# Altium PCB TYPEC_4KRECEIVER-v1.0.PcbDoc (part 10 of 12)
Units mil, origin at the board's own origin, x right, y up, seen from the top; angles counter-clockwise.
Board outline 2834.7 x 1259.84 mil, 10 copper layers (Top Layer, GND-1, Signal L1, GND-2, PWR-1, PWR-2, GND-3, Signal L2, GND-4, Bottom Layer), stack 61.686 mil thick; 492 components, 339 nets, 2214 pads, 1169 vias.
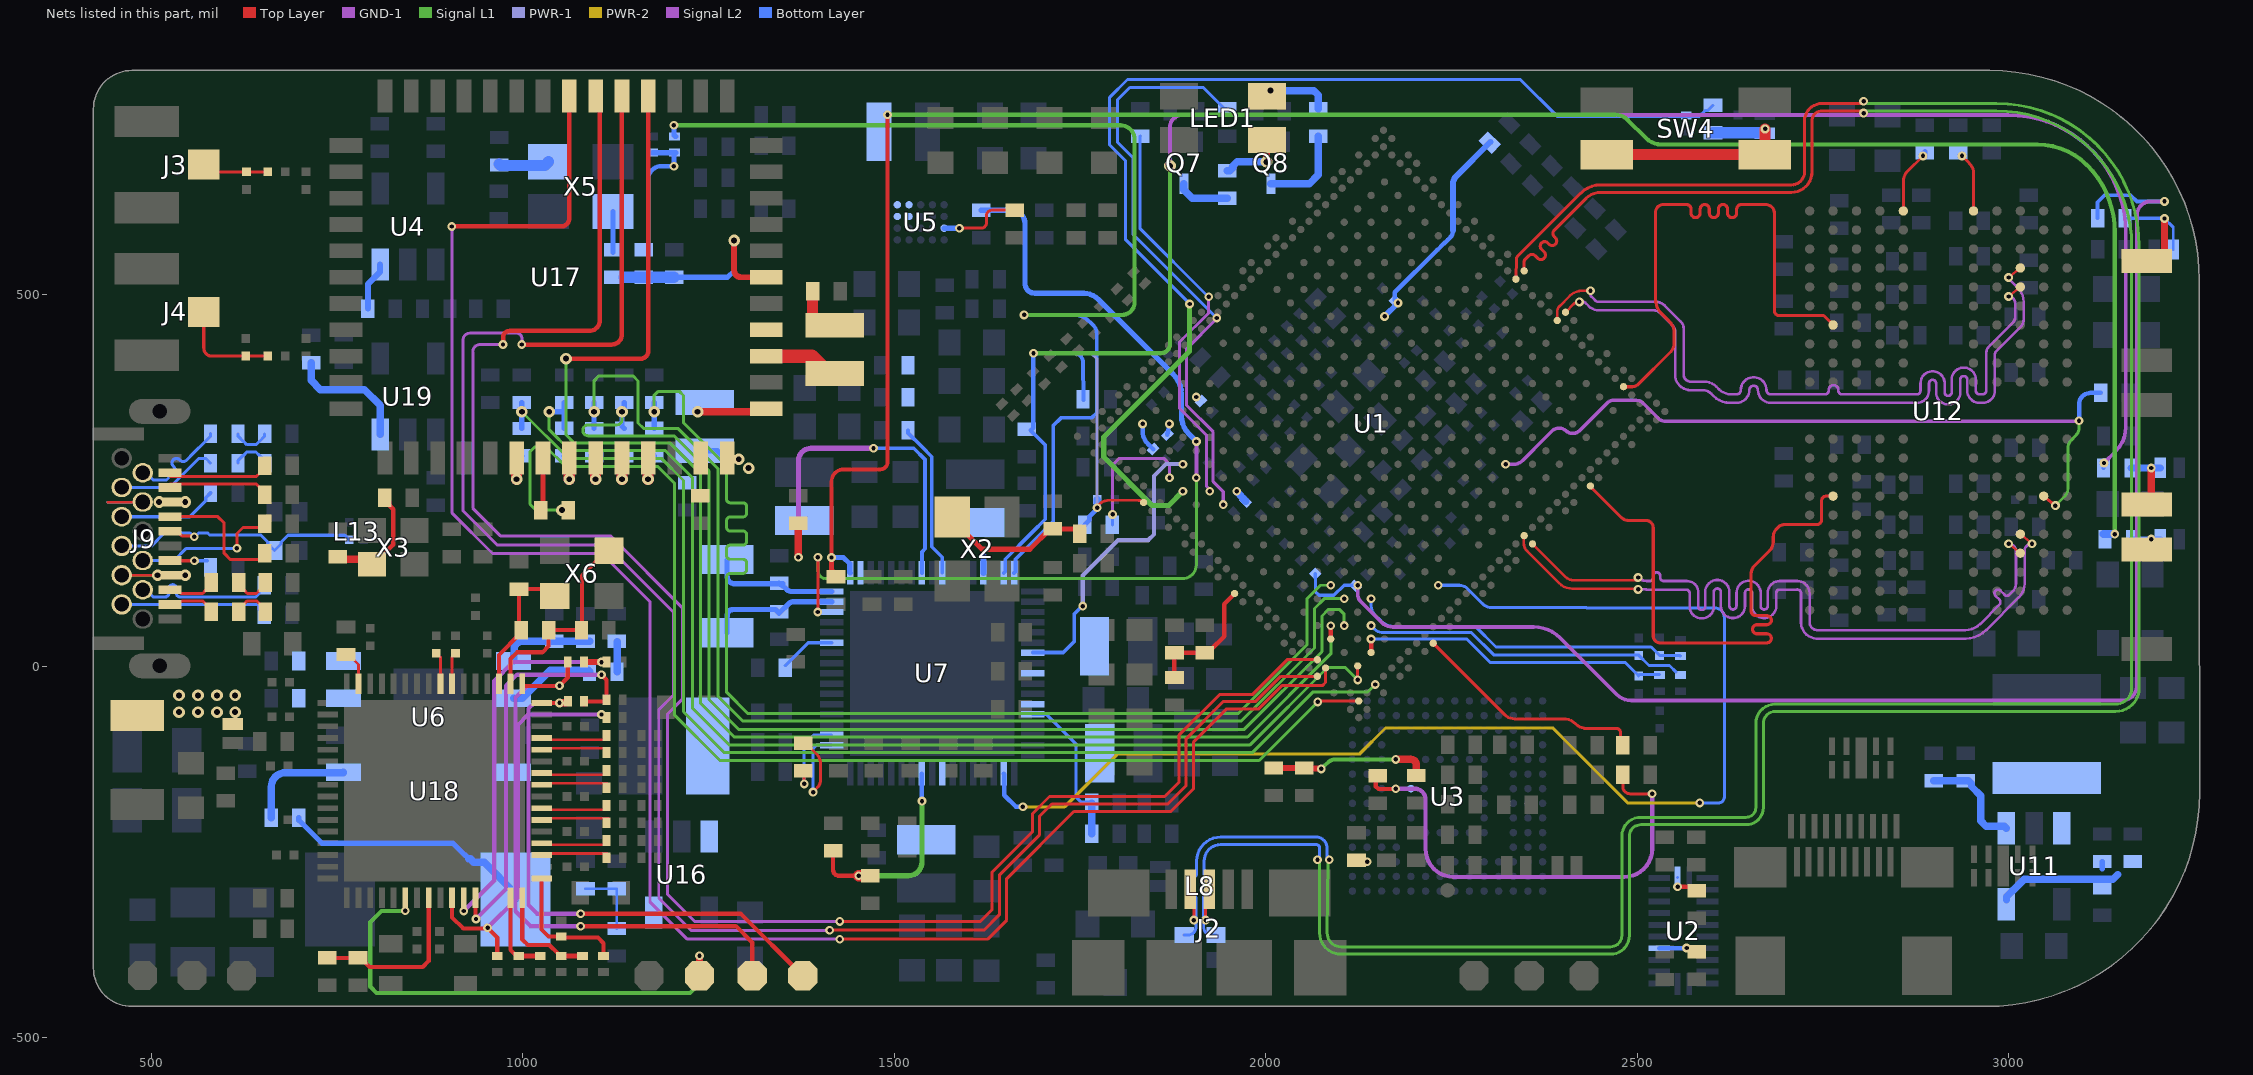
[diagram p15: the nets of this part, all layers, seen from the top]

## Via types
v1: diameter 11.81, hole 5.91, Top Layer to Bottom Layer, tented both sides, 698 vias
v2: diameter 15.75, hole 7.87, Top Layer to Bottom Layer, tented both sides, 248 vias
v3: diameter 11.81, hole 5.91, Top Layer to Signal L1, tented both sides, 121 vias
v4: diameter 11.81, hole 5.91, Top Layer to Bottom Layer, 44 vias
v5: diameter 11.81, hole 5.91, Signal L2 to Bottom Layer, 41 vias
v6: diameter 11.81, hole 5.91, Top Layer to Signal L1, 17 vias

## Nets (pads, with @x,y where several pads share a name; then routed paths per layer and width w, separated by ;. In a path a pad name is that pad's centre, name@x,y a point inside that pad or via, vN(x,y) a via of type N, cw(c..) or ccw(c..) an arc to the next point about the centre after c; other vN are vias at no path point) (continued)
LPDDR4_DQS1_A_N: U1.N2 U12.E10 | length 1014
  Top Layer w3.5: U1.N2@2392.59,465.02 2392.59,476.72 cw(c2404.08,476.72) 2393.97,482.17 cw(c2404.08,476.72) 2395.96,484.84 2409.4,498.28 cw(c2425.68,482) 2425.68,505.03 v1(2437.36,505.03) ; v1(3000.07,497.37) U12.E10@3015.82,510.17
  Signal L2 w3.5: v1(2437.36,505.03) 2437.36,499.79 ccw(c2441.3,499.79) 2438.5,497.02 2443.1,492.42 ccw(c2448.72,498.21) 2448.72,490.14 2525.32,490.14 cw(c2525.32,473.51) 2537.12,485.23 2558.34,464 2558.95,463.39 cw(c2549.9,454.33) 2562.7,454.33 2562.7,453.46 2562.7,392.15 ccw(c2572.14,392.15) 2572.14,382.72 2590.25,382.72 ; 2590.43,382.72 cw(c2590.5,359.9) 2606.69,375.98 2606.8,375.87 2610.23,372.43 ccw(c2626.4,388.6) 2626.4,365.74 2633.9,365.74 ccw(c2633.9,371.49) 2639.65,371.49 cw(c2656.9,371.5) 2674.15,371.5 ccw(c2679.9,371.49) 2679.9,365.74 2745.06,365.74 2752.94,365.74 ccw(c2752.94,370.76) 2757.96,370.76 2757.96,370.89 cw(c2764.44,371.5) 2770.92,370.86 2770.92,370.74 ccw(c2775.93,370.74) 2775.93,365.74 2783.82,365.74 2876.71,365.74 ccw(c2876.71,370.49) 2881.46,370.49 2881.46,380.46 cw(c2897.71,380.46) 2913.96,380.46 2913.96,368.33 ccw(c2918.71,368.33) 2923.46,368.33 2923.46,385.46 cw(c2939.71,385.46) 2955.96,385.46 2955.96,370.49 ccw(c2960.71,370.49) 2960.71,365.74 2964.69,365.74 ccw(c2964.69,371.19) 2970.14,371.19 2970.14,420.56 2970.14,421.96 cw(c2981.37,422) 2973.43,429.94 3006.44,462.95 ccw(c3000.73,468.67) 3008.81,468.67 3008.81,488.63 ccw(c3000.07,488.63) 3005.1,495.78 ccw(c3000.07,488.63) v1(3000.07,497.37)
LPDDR4_DQS1_A_P: U1.N1 U12.D10 | length 1008
  Top Layer w3.5: U1.N1@2404.09,476.15 2404.09,476.72 2414.48,487.1 cw(c2421.55,480.02) 2421.55,490.03 v1(2422.36,490.03) ; v1(3000.07,522.96) U12.D10@3015.82,535.76
  Signal L2 w3.5: v1(2422.36,490.03) 2427.59,490.03 cw(c2427.59,486.09) 2430.37,488.88 2434.97,484.29 2435.21,484.05 ccw(c2448.72,498.21) 2448.72,478.64 2522.45,478.64 cw(c2522.45,466.58) 2530.97,475.11 2547.29,458.78 cw(c2537.85,449.34) 2551.2,449.34 2551.2,392.15 ccw(c2572.14,392.15) 2572.14,371.22 2588.33,371.22 ; 2588.42,371.22 cw(c2588.41,354.85) 2599.98,366.42 2600.02,366.38 2603.18,363.22 ccw(c2624.79,384.72) 2624.79,354.24 2633.9,354.24 ccw(c2633.9,371.49) 2651.15,371.49 cw(c2656.9,371.5) 2662.65,371.5 ccw(c2679.9,371.49) 2679.9,354.24 2876.71,354.24 ccw(c2876.71,370.49) 2892.96,370.49 2892.96,380.46 cw(c2897.71,380.46) 2902.46,380.46 2902.46,368.33 ccw(c2918.71,368.33) 2934.96,368.33 2934.96,385.46 cw(c2939.71,385.46) 2944.46,385.46 2944.46,370.49 ccw(c2960.71,370.49) 2960.71,354.24 2965.01,354.24 ccw(c2965.01,370.87) 2981.64,370.87 2981.64,419.88 cw(c2986.51,419.87) 2983.06,423.31 3016.1,456.35 ccw(c3005.94,466.51) 3020.31,466.51 3020.31,490.12 ccw(c2992.82,490.12) 3012.26,509.56 3000.07,521.75 v1(3000.07,522.96)
LPDDR4_DQS1_B_N: U1.B17 U12.V10 | length 1059.3
  Top Layer w3.5: U1.B17@2348.05,175.49 2347.57,175.01 2347.57,165.35 ccw(c2362.57,165.35) 2351.95,154.75 2395.12,111.51 ccw(c2412.9,129.17) 2412.97,104.11 v1@2500.27,104.11 ; U12.V10@3015.82,177.49 v1(3031.57,164.69)
  Signal L2 w3.5: v1(2501.36,103.11) 2512.21,102.92 ccw(c2512.7,130.45) 2512.69,102.91 2554.6,102.88 2559.42,102.88 2565.57,102.88 cw(c2565.57,97.66) 2570.75,98.37 cw(c2567.28,97.9) 2570.78,97.91 2570.79,91.51 2570.79,80.55 ; 2570.79,80.54 2570.79,80.27 ccw(c2587.04,80.27) 2603.29,80.27 2603.29,99.53 cw(c2608.04,99.53) 2612.79,99.53 2612.79,80.77 ccw(c2629.04,80.77) 2645.29,80.77 2645.29,98.4 cw(c2650.04,98.4) 2654.79,98.4 2654.79,80.77 ccw(c2671.04,80.77) 2687.29,80.77 2687.29,98.14 cw(c2692.04,98.14) 2692.04,102.89 2698.23,102.89 2715.64,102.91 cw(c2715.64,97.85) 2720.7,97.85 2720.7,58.5 ccw(c2742.44,58.61) 2741.4,36.89 ccw(c2742.08,51.88) 2742.03,36.88 2748.37,36.88 2941.99,36.88 ccw(c2941.9,76.45) 2969.71,48.3 2970.08,48.67 3014.02,92.61 ccw(c2995.85,110.81) 3021.57,110.81 3021.57,154.69 cw(c3031.57,154.69) v1(3031.57,164.69)
LPDDR4_DQS1_B_P: U1.A17 U12.W10 | length 1057.4
  Top Layer w3.5: U1.A17@2359.19,164.36 2403.55,120 ccw(c2414.15,130.61) 2414.15,115.61 2497.86,115.61 ccw(c2497.86,119.11) v1(2501.36,119.11) ; v1(3000.07,164.69) U12.W10@3015.82,151.9
  Signal L2 w3.5: v1(2501.36,119.11) ccw(c2512.7,130.45) 2506.18,115.8 ccw(c2512.7,130.45) 2512.7,114.41 2516.91,114.41 ccw(c2516.91,119.16) 2521.66,119.16 2521.66,121.19 cw(c2526.41,121.19) 2531.16,121.19 2531.16,119.16 ccw(c2535.91,119.16) 2535.91,114.41 2567.19,114.41 cw(c2567.19,99.31) 2582.17,101.26 2582.29,97.78 2582.29,80.55 ; 2582.29,80.52 2582.29,80.27 ccw(c2587.04,80.27) 2591.79,80.27 2591.79,99.53 cw(c2608.04,99.53) 2624.29,99.53 2624.29,80.77 ccw(c2629.04,80.77) 2633.79,80.77 2633.79,98.4 cw(c2650.04,98.4) 2666.29,98.4 2666.29,80.77 ccw(c2671.04,80.77) 2675.79,80.77 2675.79,98.16 cw(c2692.04,98.16) 2692.04,114.41 2715.64,114.41 cw(c2715.64,97.85) 2732.2,97.85 2732.2,58.53 ccw(c2742.44,58.61) 2741.93,48.38 ccw(c2742.08,51.88) 2742.06,48.38 2748.37,48.38 2941.97,48.38 ccw(c2941.9,76.45) 2961.61,56.46 2961.95,56.8 ; 2961.97,56.82 2987.72,82.57 ccw(c2984.35,85.92) 2987.71,89.28 2982.56,94.43 cw(c2986.18,98) 2982.58,101.59 cw(c2985.71,98.46) 2988.83,101.6 2994.43,96 ccw(c2997.79,99.36) 3001.14,96 3005.81,100.66 3006.33,101.22 ccw(c2995.52,110.95) 3007.43,102.59 ccw(c2995.52,110.95) 3010.07,110.95 3010.07,154.69 ccw(c3000.07,154.69) v1(3000.07,164.69)
LPDDR4_ODT0_CA_A: U1.E2 U12.G2 | length 745.5
  Top Layer w4.2: U1.E2@2481.68,375.93 2493.52,375.93 ccw(c2493.52,387.38) 2501.61,379.28 ; 2501.61,379.29 2545.06,422.73 ccw(c2533.47,434.31) 2549.86,434.31 2549.86,448.58 ccw(c2528.25,448.58) 2543.53,463.86 2532.49,474.9 cw(c2550.91,493.32) 2524.86,493.32 2524.86,610.71 cw(c2535.28,610.71) 2535.28,621.13 2566.43,621.13 cw(c2566.43,614.98) 2569.94,620.03 cw(c2566.43,614.98) 2572.58,614.98 2572.58,609.69 ccw(c2578.73,609.69) 2584.88,609.69 2584.88,614.98 cw(c2591.03,614.98) 2597.18,614.98 2597.18,609.69 ccw(c2603.33,609.69) 2609.48,609.69 2609.48,614.98 cw(c2615.63,614.98) 2621.78,614.98 2621.78,609.69 ccw(c2627.93,609.69) 2634.08,609.69 2634.08,614.98 cw(c2640.23,614.98) 2640.23,621.13 2673.17,621.13 cw(c2673.17,609.44) 2684.86,609.44 2684.86,478.17 ccw(c2691.33,478.17) 2691.33,471.69 2751.14,471.69 U12.G2@2763.85,458.99
LPDDR4_ODT0_CA_B: U1.A10 U12.T2 | length 760
  Top Layer w4.2: U1.A10@2437.14,242.31 2437.14,241.55 2478.35,200.33 ccw(c2488.96,210.94) 2488.96,195.94 2511.88,195.94 cw(c2511.88,186.12) 2521.7,186.12 2521.7,40.46 ccw(c2531.03,40.46) 2531.03,31.13 2674.69,31.13 ccw(c2674.69,36.97) 2678.82,32.84 ; 2674.61,31.15 ccw(c2674.61,37.25) 2674.61,43.35 2661.47,43.35 cw(c2661.47,49.45) 2661.47,55.55 2674.61,55.55 ccw(c2674.61,61.65) 2674.61,67.75 2659.63,67.75 cw(c2659.63,73.85) 2653.53,73.85 2653.53,124.14 cw(c2669.04,124.14) 2658.1,135.13 2678.86,155.88 ; 2678.86,155.89 ccw(c2668.31,166.43) 2683.23,166.43 2683.23,174.11 cw(c2697.3,174.11) 2687.34,184.05 ; 2687.35,184.06 2690.64,187.36 cw(c2697.78,180.26) 2697.78,190.33 2741.87,190.33 ccw(c2741.87,196.87) 2748.41,196.87 2748.41,222.66 cw(c2754.41,222.66) 2754.41,228.66 U12.T2@2763.85,228.67
LPDDR4_RESETn: C238.2 U1.1C7 U12.T11 | length 1040.1
  Top Layer w4.1: U12.T11@3047.31,228.67 v1(3063.06,215.87)
  Signal L1 w4: v1(3063.06,215.87) 3075.47,228.28 ccw(c3064.86,238.88) 3079.86,238.88 3079.86,293.28 cw(c3094.86,293.28) 3084.24,303.88 3090.47,310.11 ccw(c3079.86,320.71) 3094.86,320.71 v1(3094.86,330.03)
  Signal L2 w4.7: v1(2322.99,271.54) 2333.77,271.54 ccw(c2333.77,288.93) 2346.05,276.62 ; 2346.06,276.63 2377.79,308.36 ; 2377.81,308.39 2386.01,316.56 cw(c2394.98,307.57) 2388.82,318.68 cw(c2394.98,307.57) 2401.78,318.3 cw(c2394.98,307.57) 2401.96,318.19 2404.51,316.51 ; 2417.68,313.84 cw(c2413.47,325.83) 2406.5,315.21 2404.51,316.51 ; 2422.18,316.34 cw(c2413.44,325.82) 2404.51,316.51 ; 2422.2,316.36 2459.88,354.03 cw(c2468.31,345.6) 2468.31,357.53 2498.64,357.53 cw(c2498.64,343.77) 2508.37,353.5 2528.28,333.59 ccw(c2538.57,343.88) 2528.35,333.52 ccw(c2538.57,343.88) 2538.57,329.33 v1@3094.86,329.33
  Bottom Layer w6: v1(3094.86,330.03) 3094.86,352.26 cw(c3109.86,352.26) 3099.25,362.86 3099.52,363.13 cw(c3110.13,352.53) 3110.13,367.53 C238.2@3123.86,367.53
LT6711A_DDC_SCL: R124.2 R145.2 U18.59 | length 530.8
  Top Layer w3.5: v6@920.79,-329.79 U18.59@920.8,-311.78
  Top Layer w8: R124.2@1082.42,5.47 R145.2@1113.06,5.47
  GND-1 w5.6: v6(920.77,-329.81) 961.77,-288.8 961.77,-19.99 987.07,5.3 v3@1106.65,5.3
  other v3: 1106.22,5.3
LT6711A_DDC_SDA: R125.2 R146.2 U18.60 | length 563.8
  Top Layer w5.6: U18.60@936.55,-311.78 936.55,-339.77 v6(937.3,-340.52) ; R125.2@1082.71,-51.44 1086.28,-47.88 1110.62,-47.88 R146.2@1113.06,-45.44 1113.06,-18.52 v3(1106.22,-11.68)
  GND-1 w5.6: v6(937.3,-340.52) 977.84,-299.99 977.84,-26.55 992.71,-11.68 v3(1106.22,-11.68)
LT6711A_RST_N: C324.2 R132.2 U18.56 | length 230.5
  Top Layer w5.6: C324.2@737.03,-392.79 781.9,-392.79 R132.2@788.1,-398.99 ; R132.2@788.1,-399.04 794.3,-405.24 865.58,-405.24 873.56,-397.26 U18.56@873.56,-311.77
LT6711A_RXHPD: R147.2 R148.2 U18.58 | length 533
  Top Layer w5.6: 905.05,-338.52 U18.58@905.05,-311.77 ; 905.15,-338.52 920.15,-353.52 947.19,-353.52 947.26,-353.45 951.65,-353.45 v6(952.84,-352.27) 965.82,-365.25 R148.2@965.82,-390.47
  GND-1 w5.6: v6(952.84,-352.27) 993.71,-311.4 993.71,-79.13 1007.49,-65.34 v3(1106.22,-65.34)
LT6711A_S_SCL: R124.1 TP17.1 U18.17 | length 822.8
  Top Layer w5.6: U18.17@999.54,-23.77 999.54,-25.58 1000.68,-26.72 v1(1049.61,-26.72) 1060.77,-15.56 R124.1@1060.77,5.47 ; v4(1078.03,-350.19) 1286.97,-350.19 1309.05,-372.27 TP17.1@1309.05,-416.94
  Signal L2 w5.6: v1(1049.61,-26.72) 1006.44,-26.72 990.64,-42.52 990.64,-330.11 1010.71,-350.19 v4(1078.03,-350.19)
LT6711A_S_SDA: R125.1 TP16.1 U18.16 | length 753.5
  Top Layer w5.6: U18.16@1025.43,-49.67 v1(1049.61,-49.67) ; R125.1@1058.17,-49.67 R125.1@1061.06,-49.67 ; v4(1078.03,-333.38) 1293.5,-333.38 TP16.1@1377.06,-416.94
  Top Layer w10: v1(1049.61,-49.67) R125.1@1058.17,-49.67
  Signal L2 w5.6: v1(1049.61,-49.67) 1015.71,-49.67 1007.94,-57.44 1007.94,-321.89 1019.42,-333.38 v4(1078.03,-333.38)
NetC5_2: C5.2 L1.1 U17.25 | length 35.5
  Bottom Layer w7: L1.1@1245.36,289.76 1262.18,289.76 L1.1@1275.41,276.53
  other v2: 1304.17,266.32 1290.99,278.37
NetC6_2: C6.2 C184.2 J3.1 | length 74.6
  Top Layer w4.2: J3.1@582.36,665.16 629.29,665.16 C6.2@656.98,665.16
NetC7_2: C7.2 C185.2 J4.1 | length 140.9
  Top Layer w4.2: J4.1@570.88,476.5 570.88,427.84 ccw(c581.59,427.84) 581.59,417.13 629.29,417.13 C7.2@656.98,417.13
NetC10_1: C10.1 U6.1 | length 149.7
  Bottom Layer w10: C10.1@661.81,-203.99 661.81,-162.52 cw(c680.61,-162.52) 680.61,-143.72 758.85,-143.72 U6.1@758.85,-143.28
NetC10_2: C10.2 L12.1 U6.8 | length 344.3
  Bottom Layer w7: C10.2@698.81,-203.99 698.81,-207.49 704.31,-212.99 704.48,-212.99 730.11,-238.62 906.39,-238.62 922.56,-254.78 923.14,-254.78 927.37,-259.02 927.37,-259.6
  Bottom Layer w10: 927.37,-259.6 929.52,-259.6 934.03,-264.11 948.17,-264.11 990.42,-306.35 L12.1@990.42,-314.28
NetC11_1: C11.1 R4.2 | length 41.5
  Bottom Layer w3.5: C11.1@1126.65,33.31 C11.1@1127.1,32.86
  Bottom Layer w10: R4.2@1127.1,-7.97 C11.1@1127.1,32.86
NetC31_1: C31.1 U7.46 | length 75.1
  Bottom Layer w4.5: C31.1@1353.68,0.59 1384.47,31.37 U7.46@1416.03,31.37
NetC33_2: C33.2 C128.2 R37.1 R45.1 R109.2 U1.AG38 U7.67 | length 3044.6
  Top Layer w4: v1(1773.2,212.98) 1774.71,216.74 1775.32,217.35 cw(c1789.61,202.46) 1789.61,223.09 1828.43,223.09 cw(c1828.43,212.65) 1829.71,223.02 cw(c1828.43,212.65) 1834.5,221.15 cw(c1828.43,212.65) U1.AG38@1835.82,220.04
  Signal L1 w5.6: v1(1687.55,420.97) 1858.95,420.97 ccw(c1858.95,433.33) 1871.31,433.33 v2(1871.31,673.21)
  PWR-1 w4: v1(1687.55,420.97) 1765.4,420.97 1773.2,413.17 v1(1773.2,212.98)
  Signal L2 w5: v2(1871.31,673.21) 1871.31,725.49 cw(c1887.34,725.49) 1872.77,732.16 cw(c1887.34,725.49) 1880.67,740.07 cw(c1887.34,725.49) 1887.34,741.52 1909.76,741.52 2999.52,741.52 cw(c2999.52,583.28) 3157.77,583.28 3157.77,321.73 cw(c3111.52,321.73) 3144.19,288.99 v5(3128.39,273.19)
  Bottom Layer w5: U7.67@1647.73,125.27 1649.56,127.1 1649.56,143.67 1685.75,179.87 1703.45,197.56 1703.45,297.41 1688.53,312.33 1688.42,312.33 C33.2@1685.03,315.72 ; v1(1687.55,420.97) 1742.12,420.97 cw(c1742.12,408.82) 1754.27,408.82 1755.04,358.99 R109.2@1755.06,358.08 ; R37.1@3127.86,266.54 3127.86,272.66 v5(3128.39,273.19)
  Bottom Layer w6: C33.2@1683.78,317.07 1687.55,320.84 v1(1687.55,420.97) ; R45.1@1756.68,190.07 1762.68,196.07 1762.68,200.86 1772.09,210.27 1772.09,211.86 v1(1773.2,212.98)
  Bottom Layer w10: v1(1773.2,212.98) C128.2@1773.2,223.91
NetC34_2: C34.2 U7.50 X1.1 | length 176.5
  Bottom Layer w7: X1.1@1275.18,44.81 1275.29,61 1275.34,69.18 cw(c1282.77,68.38) 1282.77,75.85 1340.36,75.85 1345.18,71.03 1357.68,83.53 cw(c1364.83,76.38) 1364.83,86.49 U7.50@1416.03,86.49
NetC35_2: C35.2 U7.51 X1.2 | length 178.2
  Bottom Layer w7: X1.2@1275.18,142.74 1275.18,121 ccw(c1285.6,121) 1285.6,110.58 C35.2@1350.24,110.58 ; C35.2@1344.24,110.58 C35.2@1345.18,111.53 ; C35.2@1345.18,110.53 1353.66,105.03 ccw(c1362.32,110.53) 1362.32,100.27 U7.51@1416.03,100.27
NetC36_2: C36.2 R5.1 R8.2 U7.61 | length 210.8
  Bottom Layer w5: R8.2@1518.68,317.21 1518.68,313.71 1537.4,294.99 1550.68,281.71 1550.68,160.46 1564.81,146.34 U7.61@1564.81,125.51
NetC37_2: C37.2 R31.1 U7.52 | length 2878.7
  Top Layer w5: v1(1415.77,146.12) 1415.77,248.36 cw(c1431.98,248.36) 1431.98,264.57 1481.18,264.57 ccw(c1481.18,274.48) 1491.09,274.48 v6(1491.09,742.07)
  Top Layer w7: C37.2@1415.77,126.1 v1(1415.77,146.12) ; C37.2@1418.77,126.1 C37.2@1421.78,123.1
  Signal L1 w5.6: v6@1492.43,742.07 2470.61,742.07 cw(c2470.61,718.39) 2487.34,735.15 ; 2487.36,735.13 2511.87,710.62 ccw(c2533.01,731.83) 2533.01,701.88 3038.74,701.88 ; 3038.78,701.88 cw(c3038.8,607.32) 3105.73,674.13 cw(c3015.5,584.07) 3142.98,584.07 v1(3142.98,177.51)
  Bottom Layer w7: v1@1418.77,146.12 1431.6,146.12 1440.2,137.52 1440.2,126.1 U7.52@1441.03,125.27
  Bottom Layer w11: R31.1@3127.79,177.51 v1(3142.98,177.51)
NetC39_1: C39.1 U7.37 | length 114.1
  Top Layer w4.1: C39.1@1377.68,-140.76 1378.97,-142.04 v1(1378.97,-158.71)
  Bottom Layer w4.1: v1(1378.97,-158.71) 1378.74,-158.48 1378.74,-105.97 1392.07,-92.65 U7.37@1416.03,-92.65
NetC39_2: C39.2 U7.36 | length 164.1
  Top Layer w4.1: C39.2@1377.68,-103.76 1381.18,-103.76 1388.13,-110.71 1388.13,-110.93 1395.65,-118.45 ; v1@1392.35,-168.06 1396.78,-163.63 ccw(c1386.16,-153.03) 1401.16,-153.03 1401.16,-131.76 ccw(c1382.35,-131.76) 1395.67,-118.46
  Bottom Layer w4.1: v1(1390.97,-169.74) 1390.97,-153.8 1390.61,-153.44 1390.61,-111.68 1395.86,-106.43 U7.36@1416.03,-106.43
NetC56_2: C56.2 R169.2 | length 51.8
  Top Layer w4.1: C56.2@617.86,112.42 617.85,108.87 624.81,101.92 625.18,101.92 629.4,97.69 641.8,97.69 646.03,101.91 646.4,101.91 653.36,108.87 R169.2@653.36,112.39
NetC57_2: C57.2 R170.2 | length 51.8
  Top Layer w4.1: C57.2@617.85,73.08 617.85,76.6 624.8,83.55 625.17,83.55 629.4,87.77 641.8,87.77 646.03,83.56 646.4,83.56 653.35,76.6 R170.2@653.35,73.08
NetC58_2: C58.2 R173.2 | length 51.8
  Bottom Layer w4.1: C58.2@617.17,273.28 617.17,276.8 624.13,283.76 624.5,283.76 628.72,287.98 641.12,287.98 645.35,283.77 645.72,283.77 652.68,276.81 R173.2@652.68,273.29
NetC59_2: C59.2 R174.2 | length 51.8
  Bottom Layer w4.1: C59.2@617.18,312.57 617.18,309.05 624.13,302.09 624.5,302.09 628.73,297.87 641.14,297.88 645.36,302.1 645.73,302.1 652.68,309.05 R174.2@652.68,312.57
NetC129_2: C129.2 R46.2 X2.1 | length 206.4
  Top Layer w7: X2.1@1578.32,200.83 1578.32,196.9 1598.44,176.78 1598.88,176.78 1618.45,157.21 1682.47,157.21 1709.78,184.53 C129.2@1713.28,184.53 1744.28,184.53 1749.78,179.03 R46.2@1749.78,178.03
NetC151_2: C151.2 R29.1 U1.1N5 U1.1N6 | length 291.2
  Bottom Layer w6: C151.2@2174.03,492.41 2173.88,492.56 2173.88,495.8 2174.03,495.95 2174.03,502.9 2231.16,560.03 2231.45,560.03 2240,568.58 cw(c2244.21,564.3) 2240.48,569 ccw(c2232.52,579.16) 2241.62,570.02 ccw(c2232.52,579.16) 2241.77,570.17 2245.42,573.89 2250.58,579.16 ccw(c2237.36,586.24) 2252.36,586.24
  Bottom Layer w8: v1(2160.14,470.59) v1(2178.23,488.68) ; 2252.36,586.24 2252.36,648.81 cw(c2267.36,648.81) 2256.75,659.42 R29.1@2302.81,705.48
NetC167_2: C167.2 L9.1 U17.29 | length 69.7
  Top Layer w15: L9.1@1390.33,461.9 1399.56,452.67 L9.1@1419.83,452.67 ; L9.1@1390.33,467.9 C167.2@1390.33,504.24
NetC203_2: C203.2 R99.1 U11.1 | length 146.3
  Bottom Layer w10: R99.1@2899.07,-154.63 C203.2@2942.59,-154.62 2946.09,-154.62 2950.09,-158.62 2950.09,-162.12 2962.36,-174.4 2962.36,-208.44 2969.63,-215.72 2994.28,-215.72 U11.1@2996.95,-218.39
NetC216_2: C216.2 D11.2 R39.2 SW4.1 SW4.3 | length 312.7
  Top Layer w15: SW4.1@2459.06,688.29 SW4.3@2671.66,688.29 ; SW4.3@2672.36,688.99 v1(2672.36,722.86)
  Bottom Layer w15: R39.2@2602.17,717.68 D11.2@2668.41,717.68
NetC251_1: C251.1 R28.2 R107.2 U3.K5 | length 232.8
  Top Layer w8: R28.2@2011.19,-137.34 2011.32,-137.48 2052.31,-137.48 2052.75,-137.91 2074.3,-137.91 v3(2074.86,-138.47)
  Top Layer w10: v1(2175.19,-125.74) 2195.64,-125.76 cw(c2195.64,-132.72) 2202.6,-132.72 R107.2@2202.6,-147.31
  Signal L1 w5.6: v3(2074.86,-138.47) 2074.86,-137.48 2085.64,-128.47 cw(c2093.16,-137.48) 2093.16,-125.74 v1@2172.2,-125.74
  Bottom Layer w4: v1(2175.19,-125.74) U3.K5@2195.64,-125.76
NetC252_2: C252.2 U3.C2
  other v1: 2136.59,-263.56
NetC254_1: C254.1 R100.1 R101.2 U11.5 | length 176
  Bottom Layer w7: 3126.19,-273.25 C254.1@3126.19,-263.07
  Bottom Layer w10: U11.5@2997.2,-314.49 2997.2,-310.66 3005.26,-302.6 3005.53,-302.6 3021.21,-286.91 3140.52,-286.91 3146.77,-280.66
NetC275_2: C275.2 R159.1 X3.3 | length 156.8
  Top Layer w6: X3.3@797.31,136.88 799.28,136.88 825.89,163.49 825.89,210.96 820.35,216.5 820.35,220.73 R159.1@814.35,226.73
  Top Layer w10: C275.2@751.07,143.89 790.3,143.89 X3.3@797.31,136.88
NetC292_1: C292.1 R113.1 R118.1 U16.5 | length 95.8
  Bottom Layer w3.5: R118.1@1084.6,-299.77 C292.1@1126.89,-299.77 R113.1@1126.89,-353.29
NetC320_1: C320.1 U18.23 | length 42.9
  Top Layer w4.1: U18.23@905.05,-23.78 905.05,12.39 C320.1@909.8,17.14
NetC321_1: C321.1 U18.24 | length 35.6
  Top Layer w4.1: U18.24@889.3,-23.78 C321.1@889.3,11.87
NetD3_2: D3.2 R44.2 SW3.1 | length 278.2
  Top Layer w5: SW3.1@3158.89,545.39 SW3.1@3186.17,545.39 3209.87,559.03 3196.14,555.35 SW3.1@3158.89,545.39
  Top Layer w10: SW3.1@3186.17,545.39 3196.14,555.35 3208.7,555.35 3209.87,556.53 v1(3209.87,602.3)
  Bottom Layer w4: v1(3209.87,602.3) 3221.67,590.5 D3.2@3221.67,560.58
  Bottom Layer w5: R44.2@3159.81,602.53 3209.64,602.53 v1(3209.87,602.3)
NetJ9_A5: J9.A5 R116.2 | length 47.5
  Top Layer w5: J9.A5@527.36,141.93 527.51,141.77 v1@557.97,141.77
  Bottom Layer w5: v1(558.27,141.77) R116.2@575.09,141.77
NetJ9_A8: J9.A8 R114.2 | length 180.2
  Top Layer w4.1: J9.A8@525.36,200.99 589.81,200.99 598.36,192.45 598.36,151.66 606.81,143.21 646.59,143.21 653.09,149.71 R114.2@653.09,151.69
NetJ9_B5: J9.B5 R117.2 | length 133.1
  Bottom Layer w5: J9.B5@462.4,200.99 551.94,200.99 573.36,222.41 573.36,226.53 R117.2@579.86,233.03
NetJ9_B8: J9.B8 R115.2 | length 194.5
  Top Layer w4.1: v1(615.48,158.45) 615.48,178.22 623.73,186.47 648.04,186.47 R115.2@653.09,191.53
  Bottom Layer w4.1: J9.B8@490.73,141.93 530.88,141.93 547.4,158.45 v1(615.48,158.45)
NetL1_2: L1.2 U17.26 | length 94.1
  Top Layer w10: v2(1235.57,342.23) 1323.93,342.23 U17.26@1327.97,346.26
NetL2_1: L2.1 U5.D3 U5.D4 U5.E3 U5.E4
NetL3_2: L3.2 U7.12
NetL4_2: L4.2 U7.9
NetL5_1: L5.1 U7.53
NetL6_2: L6.2 U7.65 | length 23.2
  Bottom Layer w8: U7.65@1620.17,125.27 1620.17,148.44
NetL7_2: L7.2 U7.25
NetL9_2: L9.2 U17.28 | length 103.2
  Top Layer w18: U17.28@1327.97,417.13 1389.52,417.13 L9.2@1418.95,387.71
NetL10_1: L10.1 U11.3
NetL11_1: L11.1 U16.3
NetLED1_1: LED1.1 R47.1 | length 88.5
  Top Layer w10: v2@2001.71,679.01 2001.27,679.45 2001.27,707.56 LED1.1@2001.71,708
  Bottom Layer w10: R47.1@1948.16,666.71 1951.66,666.71 1955.66,670.71 1955.66,672.77 1961.52,678.63 v2@2001.22,678.63
  other v2: 2001.27,678.57
NetLED1_3: LED1.3 R85.1 | length 85.4
  Top Layer w10: LED1.3@2001.54,767.24 LED1.3@2001.72,767.06
  Bottom Layer w10: v2(2006.54,774.45) 2064.82,774.45 2070.68,768.59 2070.68,754.23 2071.08,753.83 R85.1@2071.08,750.23
NetQ7_3: Q7.3 R47.2 | length 70.6
  Bottom Layer w10: Q7.3@1890.07,648.81 1890.07,640.93 1901.3,629.71 R47.2@1948.16,629.71
NetQ8_3: Q8.3 R85.2 | length 121.2
  Bottom Layer w10: Q8.3@2007.15,648.81 2058.81,648.81 2071.08,661.07 R85.2@2071.08,713.23
NetR2_2: R2.2 R95.2 R96.1 U17.31 | length 286.3
  Top Layer w8: v2(1284.73,572.73) 1284.73,532.76 ccw(c1294.27,532.76) 1294.27,523.22 U17.31@1327.76,523.22
  Bottom Layer w7: R95.2@1198.98,523.22 1275.94,523.22 1284.73,532.01 v2(1284.73,572.73)
  Bottom Layer w15: 1136.24,523.23 R2.2@1163.11,523.23 R95.2@1203.98,523.23
NetR3_1: R3.1 U7.59 | length 516.3
  Top Layer w10: v1(1371.18,146.47) R3.1@1371.18,192.23
  Signal L2 w7: v1(1371.18,146.47) 1371.18,275.98 cw(c1388.31,275.98) 1388.31,293.12 v5(1472.27,293.12)
  Bottom Layer w5: v5(1472.27,293.12) 1526.55,293.12 1541.68,277.98 1541.68,157.75 1537.49,153.55 U7.59@1537.49,125.27
NetR4_1: R4.1 U6.6 | length 118.5
  Bottom Layer w10: U6.6@987.86,-43.28 999.67,-43.28 1037,-5.95 1088.08,-5.95 R4.1@1090.1,-7.97
NetR10_1: R10.1 U7.68 | length 1528
  Signal L1 w5.6: v1(1203.61,727.79) 1804.65,727.79 cw(c1804.65,708.65) 1823.79,708.65 1823.79,489.59 cw(c1806.82,489.59) 1806.82,472.62 v1(1674.96,472.62)
  Bottom Layer w5: U7.68@1661.51,125.27 1663.34,127.1 1663.34,143.7 1714.28,194.64 1714.28,323.58 1724.67,333.97 1765.76,333.97 1772.66,340.87 1772.66,447.66 ccw(c1757.43,447.66) 1768.2,458.44 1763.49,463.15 ccw(c1740.51,440.17) 1740.53,472.66 1740.48,472.66 1675,472.66 v1(1674.96,472.62)
  Bottom Layer w7: v1(1203.61,727.79) 1203.61,714.41 1205.42,712.59 R10.1@1206.61,712.59
NetR11_2: R11.2 U6.4
NetR12_1: R12.1 U5.A2 | length 112.9
  Top Layer w4: v1@1588.06,589.32 1617.55,589.32 ccw(c1617.55,595.95) 1624.18,595.95 1624.18,606.04 cw(c1631.66,606.04) 1631.66,613.53 R12.1@1662.36,613.53
  Bottom Layer w7: U5.A2@1567.36,589.31 v1@1587.86,589.31
  other v1: 1587.86,589.11
NetR14_2: R14.2 U1.1V19 | length 38.7
  Bottom Layer w6: v1(1834.42,325.83) 1834.42,316 ccw(c1858.15,316) 1841.37,299.21 R14.2@1848.57,292.01
NetR15_2: R15.2 U1.1U18 | length 14.8
  Bottom Layer w6: R15.2@1867.74,311.41 1869.14,317.49 1870.61,325.81 v1(1870.52,325.83)
NetR20_2: R20.2 R23.2 U7.13 | length 212.1
  Bottom Layer w4.5: U7.13@1686.51,-65.09 1705,-65.09 1744.93,-105.02 1744.93,-176.34 1752.1,-183.51 1764.98,-183.51 R20.2@1765.89,-184.42
  Bottom Layer w10: R23.2@1765.89,-225.97 R20.2@1765.89,-184.42
NetR24_2: R24.2 R25.1 U7.27 | length 289
  Top Layer w5.6: R24.2@1417.97,-248.51 1417.97,-274.48 ccw(c1425.86,-274.48) 1425.86,-282.37 v6(1452.46,-282.4)
  Top Layer w15: v6(1452.46,-282.4) R25.1@1468,-282.37
  Signal L1 w7: v6(1452.46,-282.4) 1519.02,-282.4 ccw(c1519.02,-263.91) 1537.5,-263.91 v1(1537.5,-181.83)
  Bottom Layer w6: v1@1537.49,-176.02 U7.27@1537.49,-145.21
NetR27_2: R27.2 U4.3 | length 66.2
  Bottom Layer w8: R27.2@791.69,481.02 791.69,513.98 808.23,530.52 U4.3@808.23,540.37
NetR30_2: R30.2 U1.1M18 | length 18.1
  Bottom Layer w10: v1(1961.09,235.35) R30.2@1973.01,221.68
NetR32_2: R32.2 R33.1 U6.5 | length 124
  Bottom Layer w10: U6.5@987.86,6.72 988.23,13.54 988.76,23.47 988.86,25.36 cw(c999.67,21.99) 999.67,33.31 R32.2@1084.6,33.31 R32.2@1090.6,33.31
NetR34_2: R34.2 U1.1N19 | length 549.8
  Signal L2 w4.1: v5(1923.42,496.9) 1923.42,475.23 1884.22,436.04 1884.22,346.87 1920.39,310.71 1920.39,241.93 1924.89,237.43 v1(1924.89,235.34)
  Bottom Layer w4.1: R34.2@1831.36,713.23 1830.72,712.59 1830.72,589.13 v5@1923.18,496.67
NetR38_1: R38.1 U6.3
NetR41_2: R41.2 U1.1M19 | length 805
  Signal L2 w4.1: v5(1934.4,468.39) 1934.4,467.61 1893.3,426.5 1893.3,351.24 1929.42,315.12 1929.42,248.17 1942.99,234.6 v1(1942.99,217.25)
  Bottom Layer w4.1: v5@1935.06,467.73 v5(1934.4,468.39) 1821.25,581.54 1821.25,684.52 1800.52,705.25 1800.52,761.88 1817.28,778.64 1916.26,778.64 1944.66,750.23 R41.2@1948.16,750.23
NetR51_2: R51.2 U17.24
NetR53_2: R53.2 U1.A29 | length 318.2
  Top Layer w4.1: U1.A29@2225.56,30.73 2321.87,-65.58 ccw(c2335.02,-52.44) 2335.02,-71.02 2400.56,-71.02 cw(c2400.56,-94.77) 2408.12,-72.26 cw(c2400.56,-94.77) 2417.36,-77.98 ccw(c2431.93,-63.4) 2431.93,-84.02 2472.07,-84.02 cw(c2472.07,-89.55) 2477.6,-89.55 2477.6,-96.06 R53.2@2482.85,-106.51
NetR56_2: R56.2 R108.2 U3.H5 | length 665.2
  Top Layer w4.1: R56.2@2480.85,-146.47 2480.85,-162.29 ccw(c2490.53,-162.29) 2490.53,-171.97 v1(2520.21,-171.97)
  Top Layer w5.6: R108.2@2146.71,-147.63 2148.31,-149.23 2148.31,-162.12 2151.96,-165.77 2174.56,-165.77 v1(2175.19,-165.13)
  Signal L2 w5.6: v1@2172.2,-165.13 v1(2175.19,-165.13) 2200.86,-165.13 cw(c2200.86,-179.59) 2215.33,-179.59 2215.33,-246.17 ccw(c2253.06,-246.17) 2253.06,-283.9 2482.59,-283.9 ccw(c2482.59,-246.14) 2520.35,-246.14 v1@2520.35,-171.97
  Bottom Layer w4.1: v1(2175.19,-165.13) U3.H5@2195.64,-165.13
NetR57_2: R57.2 U17.17 | length 63.4
  Top Layer w15: v2(991.95,251.43) U17.17@991.95,279.73
  Bottom Layer w7: v2(991.95,251.43) 991.95,277.25 997.45,282.75 R57.2@998.95,282.75
NetR68_2: R68.2 U1.B37 | length 1625.3
  Top Layer w4: v3@2070.35,-47.22 U1.B37@2125.34,-47.22
  Signal L1 w4: v2(1052.77,209.74) 1018.07,209.74 1009.94,217.88 1009.94,288.44 1016.32,294.82 1031.47,294.82 1057.56,268.74 1181.61,268.74 1204.6,245.75 1204.6,-66.4 1265.52,-127.33 1991.33,-127.33 v3(2070.35,-48.31)
NetR69_2: R69.2 U17.19 | length 91.8
  Top Layer w7: v2@1062.69,251.43 v2(1062.81,251.43) U17.19@1062.81,279.73
  Top Layer w15: v2@1062.75,251.43 U17.19@1062.75,279.73
  Bottom Layer w7: R69.2@1055.81,282.76 1057.31,282.76 1062.81,277.26 v2(1062.81,251.43)
NetR70_2: R70.2 U17.20 | length 91.5
  Top Layer w7: v2@1098.12,251.43 v2(1098.25,251.43) U17.20@1098.25,279.73
  Top Layer w15: v2(1098.25,251.43) U17.20@1098.25,279.73
  Bottom Layer w7: R70.2@1091.58,282.75 1092.75,282.75 1098.25,277.25 v2(1098.25,251.43)
NetR73_1: R73.1 U1.1U16
  other v1: 1906.8,362.02
NetR76_1: R76.1 U2.11 | length 27
  Top Layer w6: v1(2554.54,-297.05) 2567.31,-297.05 cw(c2567.31,-315.1) R76.1@2580.07,-302.34
NetR77_1: R77.1 U2.4 | length 37
  Bottom Layer w6: U2.4@2529.88,-379.89 2530.07,-379.7 2566.51,-379.7 v1(2566.7,-379.51)
NetR80_2: R80.2 U17.21 | length 90.1
  Top Layer w7: v2@1133.55,251.43 v2(1133.68,251.43) U17.21@1133.68,279.73
  Top Layer w15: v2(1133.68,251.43) U17.21@1133.68,279.73
  Bottom Layer w7: R80.2@1128.68,282.76 1133.68,277.76 v2(1133.68,251.43)
NetR81_2: R81.2 U17.22 | length 65.7
  Top Layer w15: v2@1169.02,251.13 1168.97,251.18 1168.97,279.59 U17.22@1169.11,279.73
  Bottom Layer w7: v2@1168.83,250.76 v2(1168.83,251.43) 1168.83,277.26 1174.33,282.76 R81.2@1177.11,282.76
NetR94_2: R94.2 X5.1 | length 69.5
  Bottom Layer w15: R94.2@968.4,675.81 970.42,673.79 1030.16,673.79 X5.1@1035.06,678.69
NetR102_1: R102.1 U12.A8 | length 79.6
  Top Layer w4.1: v1(2937.36,686.53) 2947.37,676.51 ; 2947.38,676.5 cw(c2934.2,663.34) 2952.83,663.34 U12.A8@2952.82,612.53
NetR103_1: R103.1 U12.A5 | length 92.5
  Top Layer w4.1: U12.A5@2858.34,612.53 2858.34,652.3 cw(c2876.96,652.3) 2863.79,665.46 v1(2884.86,686.53)
  Bottom Layer w7: R103.1@2884.86,685.03 2887.36,687.53 R103.1@2887.36,692.32
NetR111_1: R111.1 R112.1 U18.1 | length 177.3
  Top Layer w5.6: U18.1@1025.43,-285.89 1025.43,-354.6 1034.84,-364.01 R111.1@1052.04,-364.01 1053.4,-365.37 1101.25,-365.37 1109.06,-373.18 R112.1@1109.06,-390.47
NetR119_1: R119.1 R120.1 U18.63 | length 112.7
  Top Layer w5.6: U18.63@983.79,-311.78 983.79,-381.98 R119.1@993.37,-391.56
  Top Layer w7: R119.1@994.83,-390.47 R120.1@1023.83,-390.47
NetR121_1: R121.1 R122.1 U18.64 | length 147.5
  Top Layer w5.6: U18.64@999.54,-311.78 999.54,-367.92 1006.98,-375.35 1035.88,-375.35 1047.56,-387.03 1047.56,-387.95 1051.23,-391.62 R122.1@1052.15,-391.62
  Top Layer w7: R122.1@1052.04,-390.47 R121.1@1080.45,-390.47
NetR123_2: R123.2 U19.3 | length 170
  Bottom Layer w10: R123.2@715.29,408.36 715.29,384.35 727.79,371.85 787.19,371.85 808.23,350.81 U19.3@808.23,311.63
NetR129_1: R129.1 U18.31 | length 48.2
  Top Layer w4: R129.1@762.26,15.45 765.76,15.45 779.07,2.13 U18.31@779.07,-23.77
OSC_32KHZ: R96.2 X5.3 | length 54.8
  Bottom Layer w7: R96.2@1121.68,556.96 X5.3@1121.68,611.76
OTG0_VBUSDET: C141.2 R16.2 R17.1 U1.T38 | length 172.9
  Top Layer w6: R16.2@1877.36,-15.45 R17.1@1877.36,18.03 C141.2@1918.18,18.03 1923.18,23.03 1927.41,23.03 1944.17,39.79 1944.17,83.41 U1.T38@1958.31,97.55
PDM_CLK0_M0: U1.1A14 U7.19 | length 1739.5
  PWR-2 w4.1: v1(1673.36,-189.43) 1673.4,-189.47 1729.49,-189.47 1800.25,-118.71 2126.06,-118.71 2161.27,-83.5 2386.62,-83.5 2487.4,-184.27 v1(2584.36,-184.27)
  Bottom Layer w4.1: v1(2232.52,108.68) 2260.99,108.68 cw(c2260.99,93.68) 2271.59,104.3 2292.05,83.84 2292.09,83.8 ccw(c2304.39,96.25) 2304.42,78.74 2331.15,78.74 2411.2,78.74 2423.41,78.73 2423.53,78.73 cw(c2423.44,-37.47) 2431.5,78.45 ccw(c2432.36,90.37) 2431.57,78.44 ccw(c2432.36,90.37) 2432.18,78.42 2454.66,78.07 ccw(c2454.86,90.03) 2454.86,78.07 2604.66,78.07 cw(c2604.66,65.29) 2617.44,65.29 2617.44,-176.46 cw(c2609.63,-176.46) 2609.63,-184.27 v1(2584.36,-184.27)
  Bottom Layer w6: U7.19@1647.73,-145.21 1648.32,-145.8 1648.32,-173.76 1663.99,-189.43 v1(1673.36,-189.43)
PMIC_32KOUT_WIFI: R2.1 R9.2 R10.2 | length 190.8
  Bottom Layer w6: R2.1@1168.99,555.81 1168.99,655.18 cw(c1186.53,655.18) 1186.53,672.73 v1(1203.61,672.73)
  Bottom Layer w7: R9.2@1174.99,690.94 R10.2@1206.61,690.94 ; v1(1203.61,672.73) R10.2@1203.61,687.94
PMIC_INT: U1.1R19 U7.7 | length 399.2
  PWR-1 w5.6: v1(1753.95,80.6) 1753.95,121.69 1801.52,169.26 1842.01,169.26 1849.83,177.09 1849.83,255.93 1865.82,271.92 1888.33,271.92 v1(1888.71,271.54)
  Bottom Layer w5: U7.7@1686.67,18.13 1727.58,18.13 1742.47,33.02 1742.47,69.98 1753.1,80.6 v1(1753.95,80.6)
PMIC_SLEEP: R13.2 U1.1P19 U7.49 | length 1285.8
  Top Layer w4: v1(1397.31,72.71) 1397.31,144.3 v3@1399.49,146.47
  Signal L1 w4: v3(1397.49,146.47) 1397.49,128.77 ccw(c1408.73,128.77) 1408.73,117.53 1887.97,117.53 ccw(c1887.97,136.36) 1906.8,136.36 v1(1906.8,253.44)
  Signal L2 w5.6: v1(1906.8,253.44) 1906.85,253.5 1906.85,302.14 v5(1906.9,302.19)
  Bottom Layer w7: R13.2@1617.36,613.53 1658.47,613.53 cw(c1658.47,595.91) 1676.09,595.91 1676.09,515.09 ccw(c1689.45,515.09) 1689.45,501.73 1755.27,501.73 cw(c1755.27,474.81) 1774.26,493.89 cw(c1755.27,474.81) 1774.3,493.85 1875.99,392.16 cw(c1849.86,366.03) 1886.81,366.03 1886.81,336.49 ccw(c1921.11,336.49) 1896.86,312.24 v5(1906.9,302.19)
PWRON_KEY: D2.2 R31.2 SW2.2 | length 39.2
  Bottom Layer w7: R31.2@3164.86,170.79 v1(3192.13,170.79) D2.2@3204.08,170.79
RESET_KEY: D1.2 R37.2 SW1.2 | length 90.6
  Top Layer w10: SW1.2@3186.17,217.6 3192.13,223.56 v1(3192.13,266.54)
  Bottom Layer w10: R37.2@3164.86,266.54 v1(3192.13,266.54) D1.2@3204.08,266.54
RX1_N: J9.B10 R172.2 | length 211.1
  Bottom Layer w4.1: J9.B10@488.73,102.55 493.29,102.55 502.87,92.98 516.76,92.98 518.81,92.98 ccw(c518.81,98.03) 523.86,98.03 523.86,104.42 cw(c528.91,104.42) 533.96,104.42 533.96,98.03 ccw(c539.01,98.03) 539.01,92.98 547.03,92.98 567.9,92.98 ; 557.47,92.98 567.9,92.98 ; R172.2@652.36,108.45 645.41,101.5 645.41,97.5 640.88,92.98 567.9,92.98
RX1_P: J9.B11 R171.2 | length 200
  Bottom Layer w4.1: J9.B11@460.4,82.88 568.59,82.88 642.63,82.88 645.41,80.11 645.41,76.1 R171.2@652.36,69.15
RX2_N: J9.A10 R175.2 | length 140.3
  Top Layer w4.1: J9.A10@525.36,240.36 525.36,245.15 641.16,245.15 ; 641.55,245.01 645.77,240.79 646.14,240.79 653.1,233.84 R175.2@653.09,230.3
RX2_P: J9.A11 R176.2 | length 140.5
  Top Layer w4.1: J9.A11@525.36,260.04 525.36,255.25 641.89,255.25 645.77,259.12 646.14,259.12 653.09,266.08 R176.2@653.09,269.6
SARADC_VIN0/RECOVERY: C156.1 R44.1 R60.1 U1.1D17 | length 2015.7
  Signal L2 w5: v1(2123.94,108.68) 2123.94,96.54 ccw(c2137.17,96.54) 2127.81,87.2 ; 2127.82,87.19 2156.27,58.74 ccw(c2170.99,73.46) 2170.99,52.64 2360.86,52.64 cw(c2360.86,2.34) 2396.41,37.92 ; 2396.42,37.91 2472.54,-38.21 ccw(c2492.17,-18.61) 2492.17,-46.35 3152.31,-46.35 ccw(c3152.31,-25.71) 3172.95,-25.71 3172.95,606.98 cw(c3191.3,606.98) 3191.3,625.32 v5(3209.87,625.32)
  Bottom Layer w4.5: C156.1@2066.81,124.04 2066.81,118.87 2067.15,118.53 2067.15,100.03 2072.17,95.01 2092,95.01 2105.84,108.85 2119.33,108.85 R60.1@2120.72,107.46
  Bottom Layer w5: R44.1@3119.81,602.53 3119.81,624.13 3129.21,633.53 3164.52,633.53 3172.72,625.32 v5(3209.87,625.32)
SARADC_VIN1/HW_ID: C157.1 R61.2 U1.1C17 | length 456.6
  Bottom Layer w4.1: v1(2142.04,90.59) 2142.04,81.15 ccw(c2159.94,81.15) 2147.28,68.49 2154.83,60.94 ccw(c2173.03,79.15) 2173.03,53.4 2282.31,53.4 2310.01,25.7 2353.13,25.7 2518.89,25.7 C157.1@2530.35,14.25 2557.58,14.25 R61.2@2558.6,13.23
SARADC_VIN2: C158.1 R62.2 U1.1B18 | length 435.9
  Bottom Layer w4.1: v1(2142.04,54.4) 2146.81,49.62 ccw(c2158.33,61.15) 2158.33,44.85 2277.11,44.85 2306.95,15.01 2501.59,15.01 2515.98,0.62 2543.68,0.62 R62.2@2552.67,-8.37
SARADC_VIN3: C159.1 R63.2 U1.1A19 | length 426.6
  Top Layer w6: U1.1A19@2142.04,18.2 v1(2142.04,36.3)
  Bottom Layer w4.1: v1(2142.04,36.3) 2270.83,36.3 2302.11,5.02 2483.81,5.02 2498.36,-9.52 2498.49,-9.52 2502.21,-13.24 C159.1@2502.21,-13.38 ; C159.1@2502.48,-11.61 R63.2@2530.11,-11.61
SDMMC1_CLK: R68.1 U17.18 | length 70
  Top Layer w7: R68.1@1027.38,209.74 U17.18@1027.38,279.73
SDMMC1_CMD: R57.1 R135.2 U1.B35 | length 1593.5
  Signal L1 w4: v2@999.19,341.98 1061.68,279.49 1186.6,279.49 1216.5,249.58 1216.5,-61.47 1271.65,-116.61 1982.15,-116.61 2064.02,-34.74 2137.82,-34.74 v1(2147.61,-24.95)
  Bottom Layer w7: R57.1@998.95,319.75 v2(998.94,342.23) R135.2@998.94,354.73
SDMMC1_D0: R80.1 R138.2 U1.1C19 | length 1593.5
  Signal L1 w4: v2(1133.68,342.23) 1133.68,331.07 cw(c1127.23,331.07) 1127.23,324.62 1088.73,324.62 ccw(c1088.73,316.95) 1081.06,316.95 ccw(c1088.14,316.95) 1088.14,309.87 1203.63,309.87 1250.78,262.73 1250.78,-45.23 1290.7,-85.16 1971.34,-85.16 2075.82,19.32 2075.82,67.4 2084.17,75.74 2099.83,75.74 2105.85,69.72 v1(2105.85,54.4)
  Bottom Layer w7: v2(1133.68,342.23) 1133.68,322.76 R80.1@1136.68,319.76 ; v2@1136.67,342.23 R138.2@1136.67,354.73
SDMMC1_D1: R81.1 R139.2 U1.1E18 | length 1593.6
  Signal L1 w4: v2(1177.11,342.23) 1177.11,364.46 1181.9,369.24 1211.51,369.24 1216.5,364.26 1216.5,327.28 1274.59,269.2 1274.59,226.42 1274.59,224.42 ccw(c1279.34,224.42) 1279.34,219.67 1296.69,219.67 cw(c1296.69,214.92) 1301.44,214.92 1301.44,205.42 cw(c1296.69,205.42) 1296.69,200.67 1279.33,200.67 ccw(c1279.33,195.92) 1274.58,195.92 1274.58,186.42 ccw(c1279.33,186.42) 1279.33,181.67 1296.69,181.67 cw(c1296.69,176.92) 1301.44,176.92 1301.44,167.42 cw(c1296.69,167.42) 1296.69,162.67 1279.33,162.67 ccw(c1279.33,157.92) 1274.58,157.92 1274.58,148.42 ccw(c1279.33,148.42) 1279.33,143.67 1296.69,143.67 cw(c1296.69,138.92) 1301.44,138.92 1301.44,129.42 cw(c1296.69,129.42) 1296.69,124.67 1279.34,124.67 ccw(c1279.34,119.92) 1274.59,119.92 1274.59,110.19 1274.59,-35.37 1303.02,-63.8 1963.21,-63.8 2055.45,28.44 2055.45,90.23 2073.91,108.68 v1(2087.75,108.68)
  Bottom Layer w7: R81.1@1177.11,319.76 R139.2@1177.11,354.73
SDMMC1_D2: R70.1 R137.2 U1.1D18 | length 1593.6
  Signal L1 w4: v2(1096.24,342.23) 1096.24,384.01 1102.87,390.63 1148.44,390.63 1155.46,383.61 1155.46,326.94 1162.55,319.86 1208.78,319.86 1262.68,265.96 1262.68,-40.3 1296.65,-74.27 1967.02,-74.27 2065.68,24.38 2065.68,77.34 2078.93,90.59 v1(2105.85,90.59)
  Bottom Layer w7: R70.1@1096.25,319.75 R137.2@1096.24,354.73
SDMMC1_D3: R69.1 R136.2 U1.1A20 | length 1593.5
  Top Layer w4: v1(2123.94,-18.73) U1.1A20@2123.95,0.11
  Signal L1 w4: v2(1035.81,342.23) 1035.81,318.03 1063.62,290.22 1192.03,290.22 1228.41,253.84 1228.41,-56.54 1277.94,-106.07 1979.3,-106.07 2083.22,-2.15 2107.36,-2.15 v1(2123.94,-18.73)
  Bottom Layer w7: v2(1035.81,342.23) 1055.81,342.23 ; R69.1@1055.81,319.76 1055.81,342.23 ; R136.2@1055.81,354.73 1055.81,342.23
SYNC_KEY: R39.1 R82.2 U1.1P20 | length 1567.5
  Signal L1 w7: v1(1888.71,235.35) 1869.56,216.19 1847.29,216.19 1782.23,281.25 1782.23,308.22 1897.71,423.7 v1(1897.71,487.28)
  Bottom Layer w4.1: v1@1897.85,487.42 1811.7,573.57 1811.7,679.69 1790.06,701.33 1790.06,765.37 1814.21,789.52 2342.78,789.52 2392.53,739.77 2565.24,739.77 R82.2@2566.2,740.73 2567.17,739.77 2583.68,739.77 2591.64,747.73 2595.22,747.73 R39.1@2602.17,754.68
TMDS_CLK_N: R128.2 U18.3 | length 98
  Top Layer w3.5: R128.2@1113.06,-258.32 1113.06,-255.7 1113.06,-252.34 U18.3@1027.48,-252.34 ; U18.3@1027.48,-252.34 ccw(c1027.48,-254.39) U18.3@1025.43,-254.39 cw(c1027.48,-254.39) U18.3@1027.48,-252.34
TMDS_CLK_P: R130.2 U18.4 | length 98.2
  Top Layer w3.5: R130.2@1113.06,-234.98 1113.06,-240.84 U18.4@1027.63,-240.84 ; U18.4@1027.63,-240.84 cw(c1027.63,-238.65) U18.4@1025.43,-238.65 ccw(c1027.63,-238.65) U18.4@1027.63,-240.84
TMDS_D0_N: R133.2 U18.6 | length 98
  Top Layer w3.5: U18.6@1025.43,-207.15 cw(c1027.48,-207.15) U18.6@1027.48,-205.1 ; U18.6@1027.48,-207.15 cw(c1029.53,-207.15) 1029.53,-205.1 1115.11,-205.1 1115.11,-208.46 R133.2@1115.11,-211.08
TMDS_D0_P: R134.2 U18.7 | length 98.2
  Top Layer w3.5: U18.7@1025.43,-191.4 ccw(c1027.63,-191.41) U18.7@1027.63,-193.6 ; U18.7@1027.48,-191.41 ccw(c1029.67,-191.41) 1029.67,-193.6 1115.11,-193.6 R134.2@1115.11,-187.74
TMDS_D1_N: R141.2 U18.9 | length 98
  Top Layer w3.5: R141.2@1113.06,-163.84 1113.06,-161.22 1113.06,-157.86 U18.9@1027.48,-157.86 ; U18.9@1027.48,-157.86 ccw(c1027.48,-159.91) U18.9@1025.43,-159.91 cw(c1027.48,-159.91) U18.9@1027.48,-157.86
TMDS_D1_P: R142.2 U18.10 | length 98.2
  Top Layer w3.5: R142.2@1113.06,-140.5 1113.06,-146.36 U18.10@1027.63,-146.36 ; U18.10@1027.63,-146.36 cw(c1027.63,-144.17) U18.10@1025.43,-144.16 ccw(c1027.63,-144.17) U18.10@1027.63,-146.36
TMDS_D2_N: R143.2 U18.12 | length 94.8
  Top Layer w3.5: U18.12@1025.43,-112.66 cw(c1027.48,-112.66) 1027.48,-110.61 1113.06,-110.61 1113.06,-113.98 R143.2@1113.06,-116.59
TMDS_D2_P: R144.2 U18.13 | length 94.7
  Top Layer w3.5: U18.13@1025.43,-96.91 ccw(c1027.63,-96.92) 1027.63,-99.11 1113.06,-99.11 R144.2@1113.06,-93.25
TSADC_SHUT_M0: R45.2 U1.1R20 | length 182.3
  Signal L2 w4: v5(1794.08,204.06) 1794.08,270.32 1803.27,279.51 1862.93,279.51 1870.61,271.83 v1(1870.61,253.44)
  Bottom Layer w4: R45.2@1793.68,190.07 1793.68,203.66 v5(1794.08,204.06)
TX1_N: C56.1 J9.A3 | length 63.5
  Top Layer w4.1: J9.A3@527.62,102.82 534.93,102.82 540.03,97.72 569.31,97.72 573.53,101.94 573.9,101.94 580.86,108.9 C56.1@580.86,112.42
TX1_P: C57.1 J9.A2 | length 63.1
  Top Layer w4.1: J9.A2@527.62,83.14 531.21,86.73 540.57,86.73 541.46,87.62 569.55,87.62 573.64,83.53 573.9,83.53 580.86,76.58 C57.1@580.86,73.11
TX2_N: C58.1 J9.B3 | length 136.4
  Bottom Layer w4.1: J9.B3@462.4,240.36 J9.B3@463.05,239.71 ; J9.B3@463.05,240.21 524.95,240.21 530.37,245.63 560.99,276.25 563.95,279.21 573.71,279.21 C58.1@579.86,273.06
TX2_P: C59.1 J9.B2 | length 136.5
  Bottom Layer w4.1: J9.B2@490.73,260.03 493.14,260.03 502.87,250.31 520.77,250.31 530.38,259.92 ccw(c526.1,264.19) 530.38,268.47 529.79,269.05 cw(c534.07,273.33) 529.79,277.61 cw(c534.07,273.33) 538.35,277.61 538.93,277.03 ccw(c543.21,281.31) 547.49,277.03 556.81,286.35 572.64,302.18 572.91,302.18 579.86,309.13 C59.1@579.86,312.63
U18_XTAL0: C322.2 R131.1 U18.18 X6.1 | length 280.5
  Top Layer w5.6: U18.18@983.79,-23.77 983.79,9.75 992.48,18.44 1026.48,18.44 1034.93,26.89 R131.1@1034.93,48.39 ; R131.1@1036.93,48.39 C322.2@1076.67,48.39 ; C322.2@1074.37,58.09 C322.2@1074.84,58.09 ; C322.2@1079.17,48.39 C322.2@1076.67,48.39 ; X6.1@1116.1,155.31 1101.18,140.39 1099.02,140.39 1080.08,121.45 1080.08,51.8 C322.2@1076.67,48.39
U18_XTALI: C323.2 R131.2 U18.19 X6.3 | length 178.4
  Top Layer w3.5: R131.2@995.17,51.16 996.44,49.88 R131.2@996.44,43.4
  Top Layer w5.6: U18.19@968.04,-23.77 968.04,15 R131.2@996.44,43.4 ; R131.2@995.17,51.16 C323.2@995.17,103.47 X6.3@1034.08,103.47
UART1_CTS: U1.G37 U17.42 | length 2561.9
  Top Layer w4: v1(1426.98,-343.73) 1615.99,-343.73 1631.47,-328.25 1631.47,-277.8 1686.12,-223.14 1686.12,-198.7 1709.1,-175.72 1864.21,-175.72 1883.18,-156.75 1883.18,-93.27 1937.92,-38.53 1982.14,-38.53 2029.13,8.46 U1.G37@2069.66,8.46
  Top Layer w6: v1(973.65,432.67) 973.65,442.07 cw(c982.53,442.07) 982.53,450.95 1089.8,450.95 ccw(c1089.8,464.86) 1103.71,464.86 1103.71,761.67 U17.42@1098.25,767.13
  Signal L2 w4: v1(973.65,432.67) 942.67,432.67 ccw(c942.67,422.9) 932.9,422.9 932.9,212.38 970.05,175.22 1118.21,175.22 1214.94,78.49 1214.94,-44.79 1195.19,-64.55 1195.19,-307.38 1231.54,-343.73 v1(1426.98,-343.73)
UART1_RTS: U1.F37 U17.43 | length 2596.9
  Top Layer w4: v1(1426.96,-367.65) 1625.9,-367.65 1651.47,-342.08 1651.47,-286.18 1741.92,-195.72 1872.49,-195.72 1903.18,-165.03 1903.18,-102.01 1947.63,-57.56 1990.89,-57.56 2021.91,-26.55 2076.39,-26.55 2080.8,-22.14 U1.F37@2080.8,-2.67
  Top Layer w6: v1(904.73,591.61) 1051.79,591.61 ccw(c1051.79,602.63) 1062.81,602.63 U17.43@1062.81,767.13
  Signal L2 w4: v1(904.73,591.61) 904.73,206.3 959.56,151.48 1106.53,151.48 1171.27,86.74 1171.27,-317.28 1221.63,-367.65 v1(1426.96,-367.65)
UART1_RXD: U1.1C20 U17.40 | length 2043.6
  Top Layer w6: v2(1058.36,413.73) 1159.11,413.73 ccw(c1159.11,423.6) 1168.99,423.6 1168.99,746.98 U17.40@1169.11,767.13 ; U1.1C20@2087.76,36.3 v1@2087.76,54.39
  Signal L1 w4: v2(1058.36,413.73) 1058.36,311.13 1069.6,299.88 1198.64,299.88 1239.13,259.4 1239.13,-49.9 1284.76,-95.53 1975.83,-95.53 2087.75,16.39 v1(2087.75,54.13)
UART1_TXD: U1.F38 U17.41 | length 2651.9
  Top Layer w4: v1(1413.13,-355.73) 1413.23,-355.64 1620.92,-355.64 1641.65,-334.91 1641.65,-281.61 1695.5,-227.76 1695.5,-202.51 1712.28,-185.72 1868.35,-185.72 1893.18,-160.89 1893.18,-97.86 1943.48,-47.56 1986.75,-47.56 2020.5,-13.81 U1.F38@2069.66,-13.81
  Top Layer w6: v1(998.94,432.67) 1119.94,432.67 ccw(c1119.94,446.41) 1133.68,446.41 U17.41@1133.68,767.13
  Signal L2 w4: v1(998.94,432.67) 998.94,441.29 ccw(c992.24,441.29) 992.24,448 929.14,448 ccw(c929.14,438.56) 919.7,438.56 919.7,208.95 965.55,163.1 1112.39,163.1 1203.04,72.44 1203.04,-39.19 1183.23,-59 1183.23,-312.33 1226.59,-355.68 v1@1413.18,-355.68
UART_TX: TP13.1 U18.54 | length 658.4
  Top Layer w10: TP13.1@1238.04,-418.91 v3@1238.04,-390.05
  Signal L1 w5.6: v3(842,-329.56) 810.23,-329.56 795.01,-344.78 795.01,-431.66 803.54,-440.19 1225.42,-440.19 1238.01,-427.59 v3(1238.01,-390.02)
USB2.0_D_N: D6.1 J2.2 L8.4 | length 118.8
  Top Layer w4.1: J2.2@1898.58,-300.61 cw(c1898.58,-305.5) 1903.47,-305.5 v1(1903.47,-341.97)
  Bottom Layer w4.1: D6.1@1890.53,-362.16 1895.5,-362.16 ccw(c1895.5,-351.34) 1906.33,-351.34 1906.33,-344.83 ccw(c1903.47,-344.83) v1(1903.47,-341.97) ccw(c1903.47,-339.15) 1906.3,-339.15 1906.3,-312.57 ccw(c1899.54,-312.57) L8.4@1899.54,-305.81
USB2.0_D_P: D7.1 J2.3 L8.3 | length 119.7
  Top Layer w4.1: v1(1919.29,-341.97) 1919.29,-305.5 cw(c1924.17,-305.5) J2.3@1924.17,-300.61
  Bottom Layer w4.1: L8.3@1923.16,-305.81 ccw(c1923.16,-312.57) 1916.4,-312.57 1916.4,-339.08 ccw(c1919.29,-339.08) v1(1919.29,-341.97) ccw(c1919.29,-344.83) 1916.43,-344.83 1916.43,-351.34 ccw(c1927.26,-351.34) 1927.26,-362.16 D7.1@1933.15,-362.16
USB2_HOST2_D_N: L8.2 U1.V1 | length 3450.1
  Top Layer w4.1: U1.V1@2348.05,531.83 2348.05,544.4 cw(c2352.15,544.4) 2348.94,546.95 2354.27,552.27 cw(c2358.54,547.99) 2362.82,552.27 2366.33,548.76 ccw(c2370.61,553.04) 2374.89,557.32 2371.38,560.83 cw(c2375.66,565.11) 2379.93,569.38 2381.57,567.75 ccw(c2385.84,572.03) 2390.12,576.31 2388.49,577.94 cw(c2392.77,582.22) 2388.49,586.5 2431.41,629.42 cw(c2450.83,610) 2446.49,637.12 cw(c2450.83,610) 2448.54,637.37 2450.83,637.46 2707.93,637.46 ccw(c2707.93,664.96) 2735.43,664.96 2735.43,733.57 cw(c2748.9,733.57) 2748.9,747.04 2802.05,747.04 cw(c2802.05,744.19) v3(2804.91,744.19)
  Signal L1 w4: v1(2085.74,-260.82) 2085.49,-260.92 2083.83,-262.58 2082.83,-359.45 ccw(c2101.28,-359.45) 2101.28,-377.9 2464.34,-377.9 ccw(c2464.34,-362.71) 2479.53,-362.71 2479.53,-229.13 cw(c2505.04,-229.13) 2505.04,-203.62 2646.87,-203.62 ccw(c2646.87,-190.63) 2659.86,-190.63 2659.86,-77.53 cw(c2686.13,-77.5) 2685.97,-51.24 2686.07,-51.24 3144.2,-51.24 ccw(c3144.2,-29.67) 3165.77,-29.67 3165.77,565.18 ccw(c2983.86,565.18) 2983.86,747.09 2807.81,747.09 ccw(c2807.81,744.19) v3(2804.91,744.19)
  Bottom Layer w4.1: L8.2@1899.54,-286.12 ccw(c1899.54,-278.5) 1907.15,-278.5 1907.15,-262.48 cw(c1939.4,-262.48) 1939.4,-230.24 2068.1,-230.24 cw(c2068.1,-244.44) 2078.14,-234.4 2078.72,-234.98 cw(c2068.68,-245.03) 2082.88,-245.03 2082.88,-257.97 ccw(c2085.74,-257.97) v1(2085.74,-260.82)
USB2_HOST2_D_P: L8.1 U1.V2 | length 3450.7
  Top Layer w4.1: U1.V2@2336.92,520.7 2337.95,549.72 2339.44,551.73 2424.3,636.59 cw(c2450.77,610.15) 2450.77,647.56 2509.04,647.56 2707.93,647.56 ccw(c2707.93,664.96) 2725.33,664.96 2725.33,733.57 cw(c2748.9,733.57) 2748.9,757.14 2802.05,757.14 ccw(c2802.05,760) v3(2804.91,760)
  Signal L1 w4: v1(2069.93,-260.82) cw(c2069.93,-263.73) 2072.83,-263.73 2072.83,-359.45 ccw(c2101.28,-359.45) 2101.28,-387.9 2464.34,-387.9 ccw(c2464.34,-362.71) 2489.53,-362.71 2489.53,-229.13 cw(c2505.04,-229.13) 2505.04,-213.62 2646.87,-213.62 ccw(c2646.87,-190.63) 2669.86,-190.63 2669.86,-77.53 cw(c2686.13,-77.5) 2686,-61.24 2686.06,-61.24 ; 2686.07,-61.24 3144.2,-61.24 ccw(c3144.2,-29.67) 3175.77,-29.67 3175.77,565.18 ccw(c2983.86,565.18) 2983.86,757.09 2807.81,757.09 cw(c2807.81,760) v3(2804.91,760)
  Bottom Layer w4.1: L8.1@1923.16,-286.12 cw(c1923.16,-280.21) 1917.25,-280.21 1917.25,-262.48 cw(c1939.4,-262.48) 1939.4,-240.34 2068.1,-240.34 cw(c2068.1,-244.44) 2070.99,-241.54 2071.58,-242.13 cw(c2068.68,-245.03) 2072.78,-245.03 2072.78,-257.97 cw(c2069.93,-257.97) v1(2069.93,-260.82)
USB_5V: D31.1 F1.1 J9.A4 J9.A9 J9.B4 J9.B9 | length 237.6
  Top Layer w3.5: 441.96,220.66 J9.B4@488.73,220.66 ; J9.B9@460.4,122.25 v2(508.73,122.25)
  Top Layer w4: v2@508.3,121.81 v2(508.73,122.25)
  PWR-1 w3.5: 441.96,220.66 J9.B4@488.73,220.66
  PWR-2 w3.5: 441.96,220.66 J9.B4@488.73,220.66 ; J9.B9@460.4,122.25 v2(508.73,122.25)
  other v2: 537.46,-62.07 563,-62.07 588.55,-62.07 613.09,-62.07 537.46,-39.53 563,-39.53 588.55,-39.53 613.09,-39.53 545.98,122.25 510.73,220.67 545.98,220.67
USB_D_N: D30.1 J9.A7 J9.B7 L13.3 | length 374.8
  Top Layer w4.1: J9.A7@525.36,181.3 535.47,181.3 541.97,174.79 557.19,174.79 v1(558.08,173.91)
  Bottom Layer w4.1: J9.B7@462.4,161.62 462.74,161.27 500.11,161.27 518.05,179.21 551.82,179.21 555.55,175.49 v1@558.08,175.49 ; v1(558.08,173.91) 559.03,173.91 564.33,179.21 575.62,179.21 578.49,176.34 647.53,176.34 657.17,166.7 657.17,164.3 D30.1@665.95,155.53 674.72,164.3 674.72,166.5 684.23,176.01 760.42,176.01 L13.3@766.55,169.87